# Altium PCB SX1262MB2xAS_e499v01b.PcbDoc
Units mm, origin at the board's own origin, x right, y up, seen from the top; angles counter-clockwise.
Board outline 65 x 53.3 mm, 4 copper layers (Top Layer, MidLayer1, MidLayer2, Bottom Layer), stack 0.986 mm thick; 64 components, 41 nets, 172 pads, 838 vias.
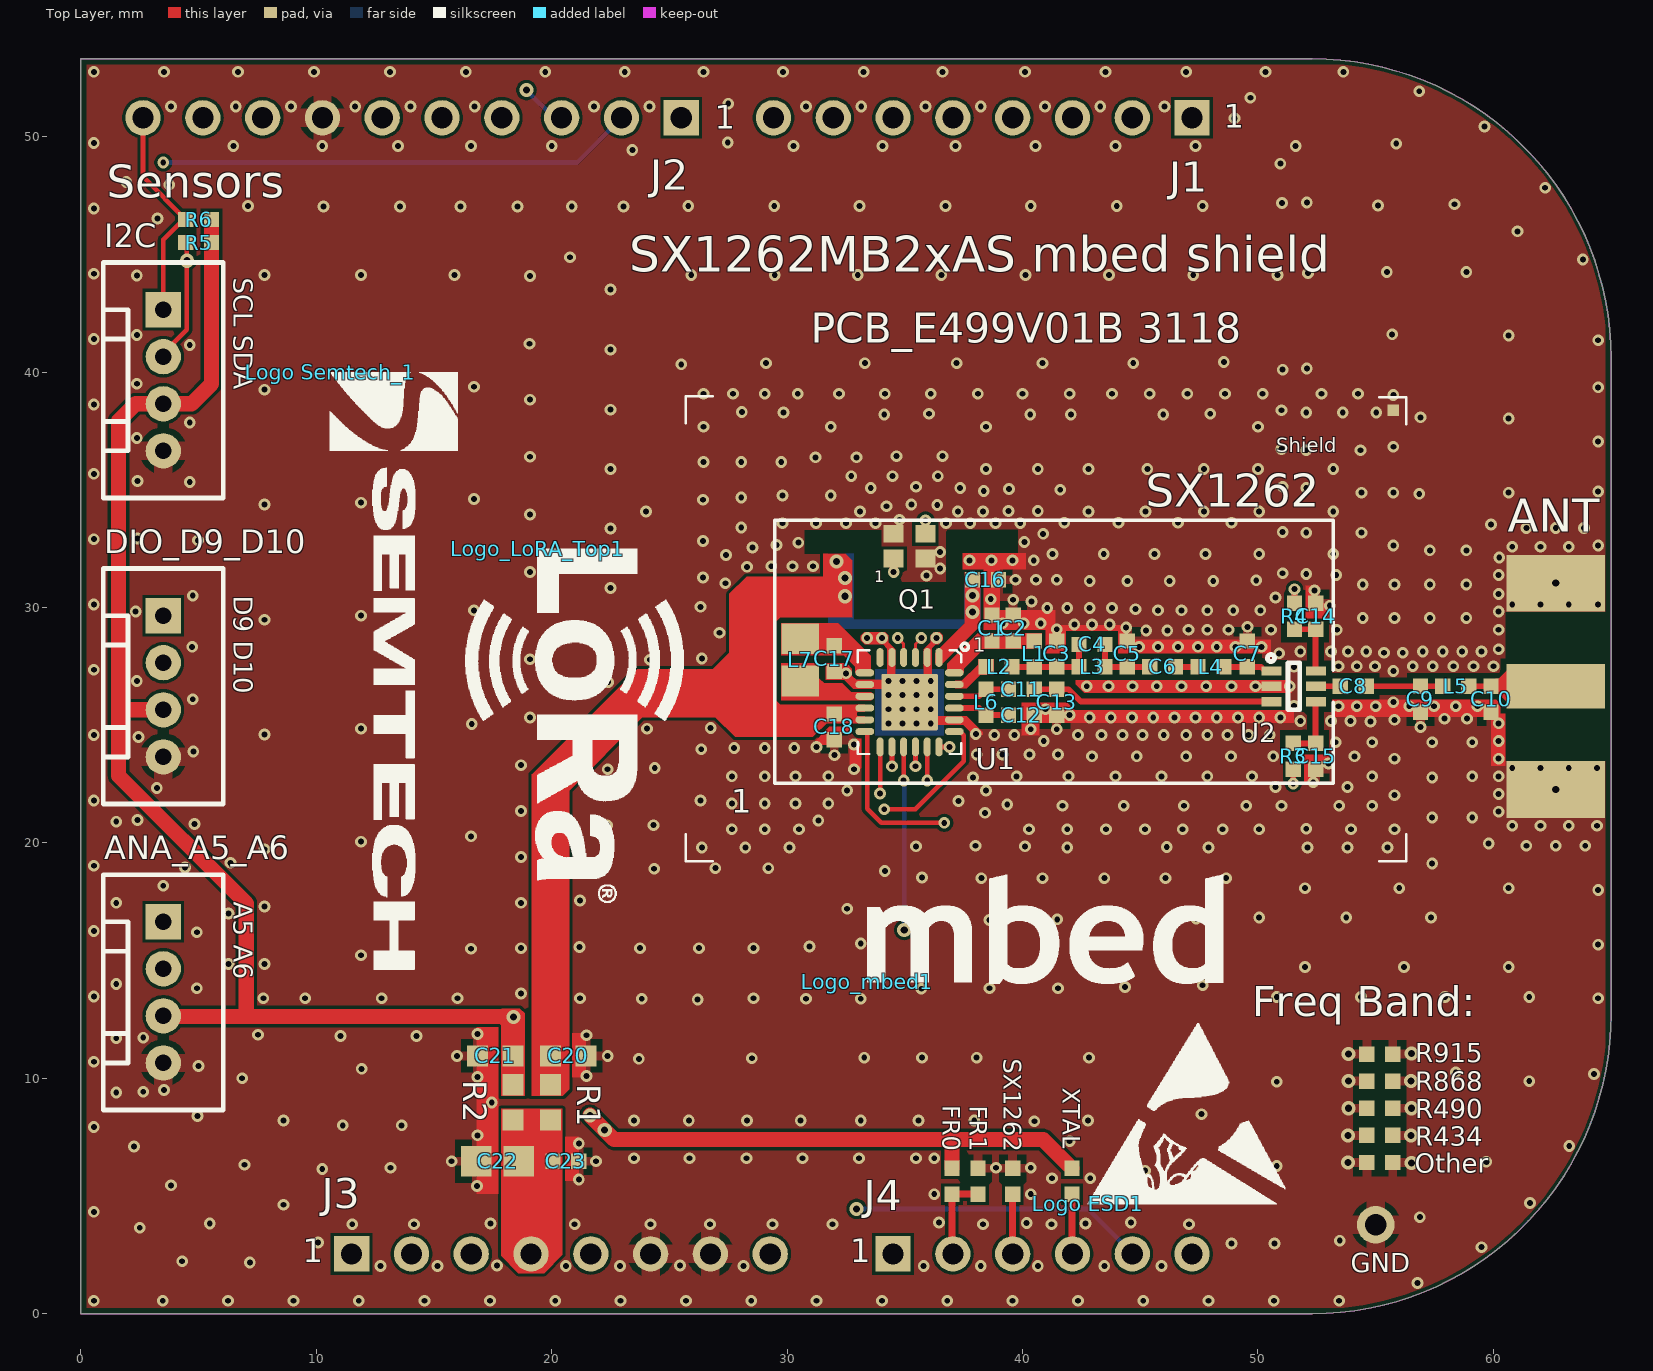
[diagram p0: Top Layer view]
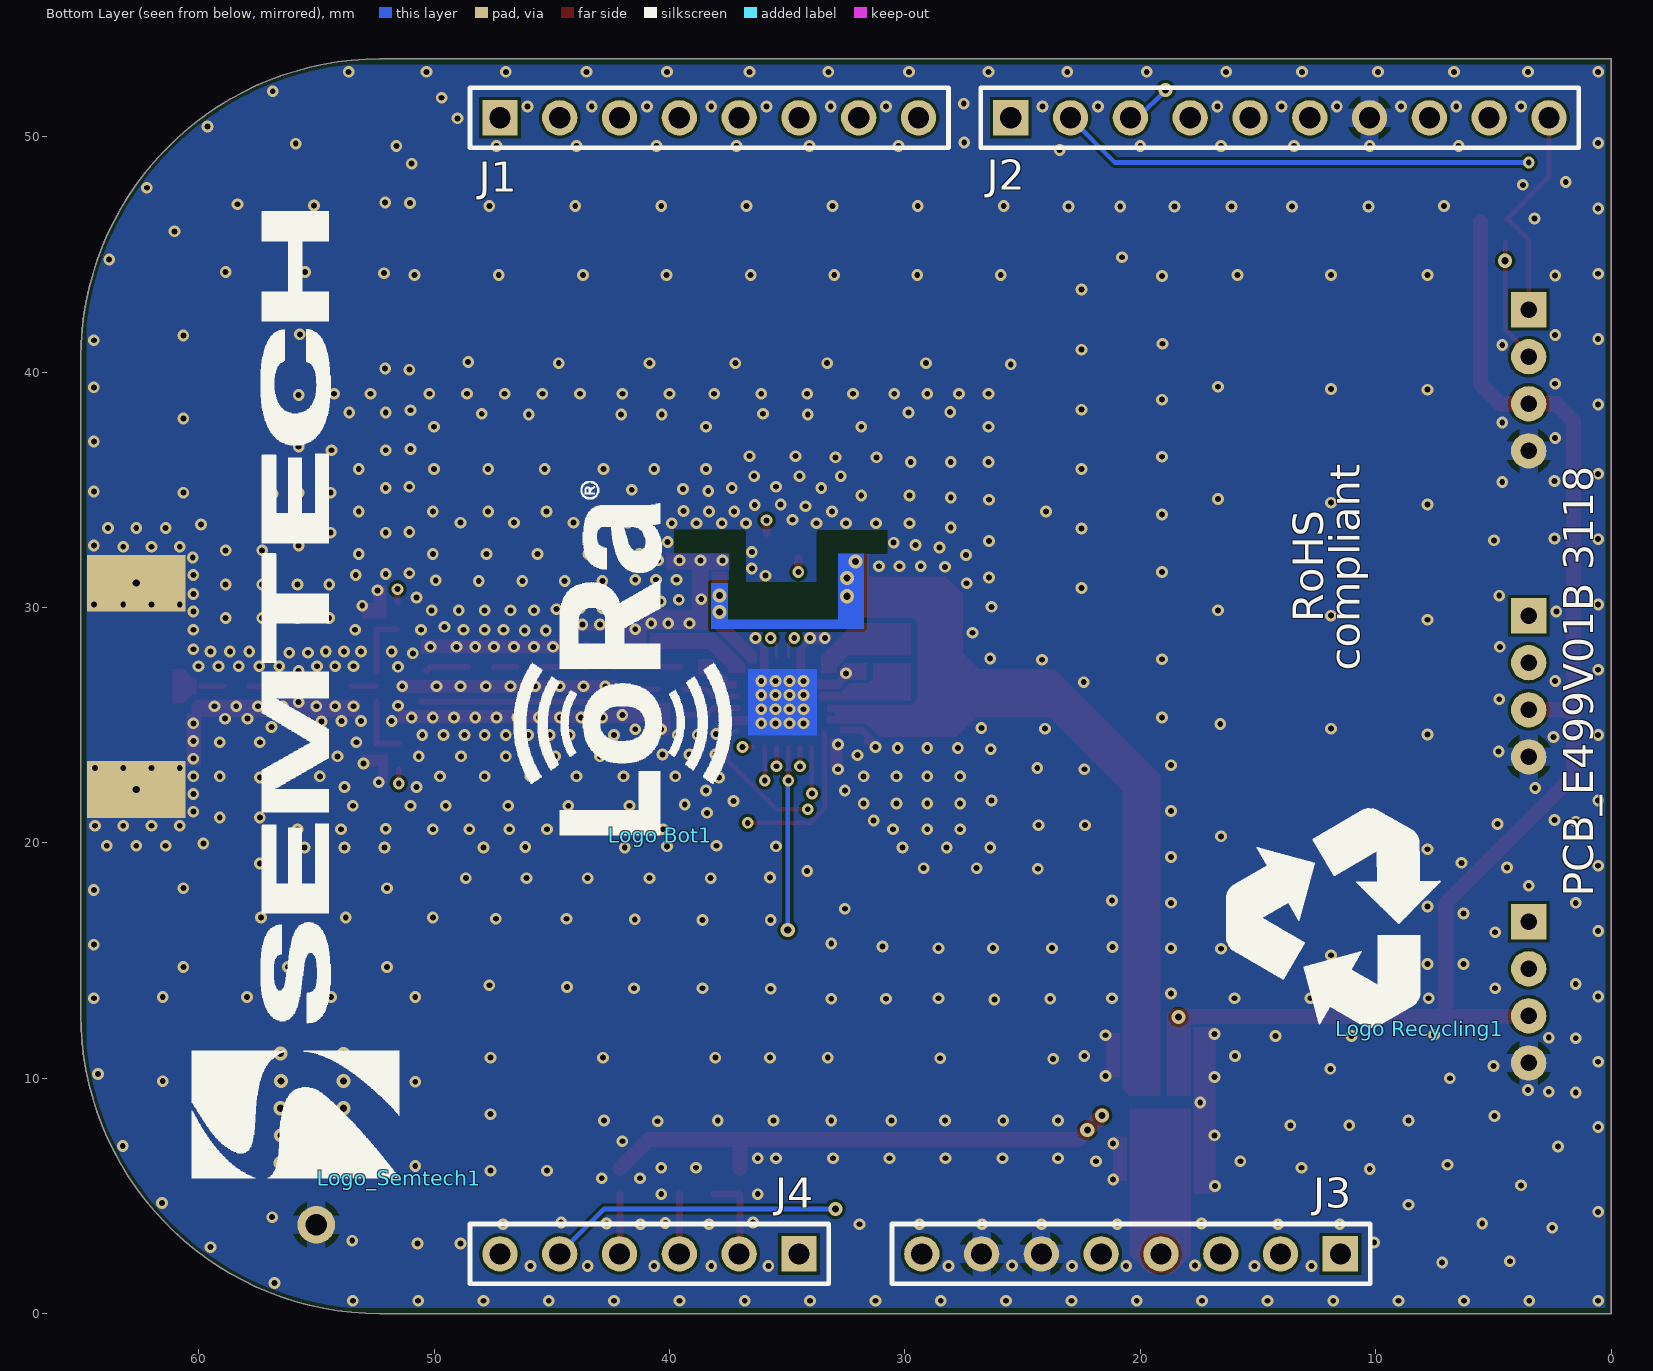
[diagram p1: Bottom Layer view, seen from below]
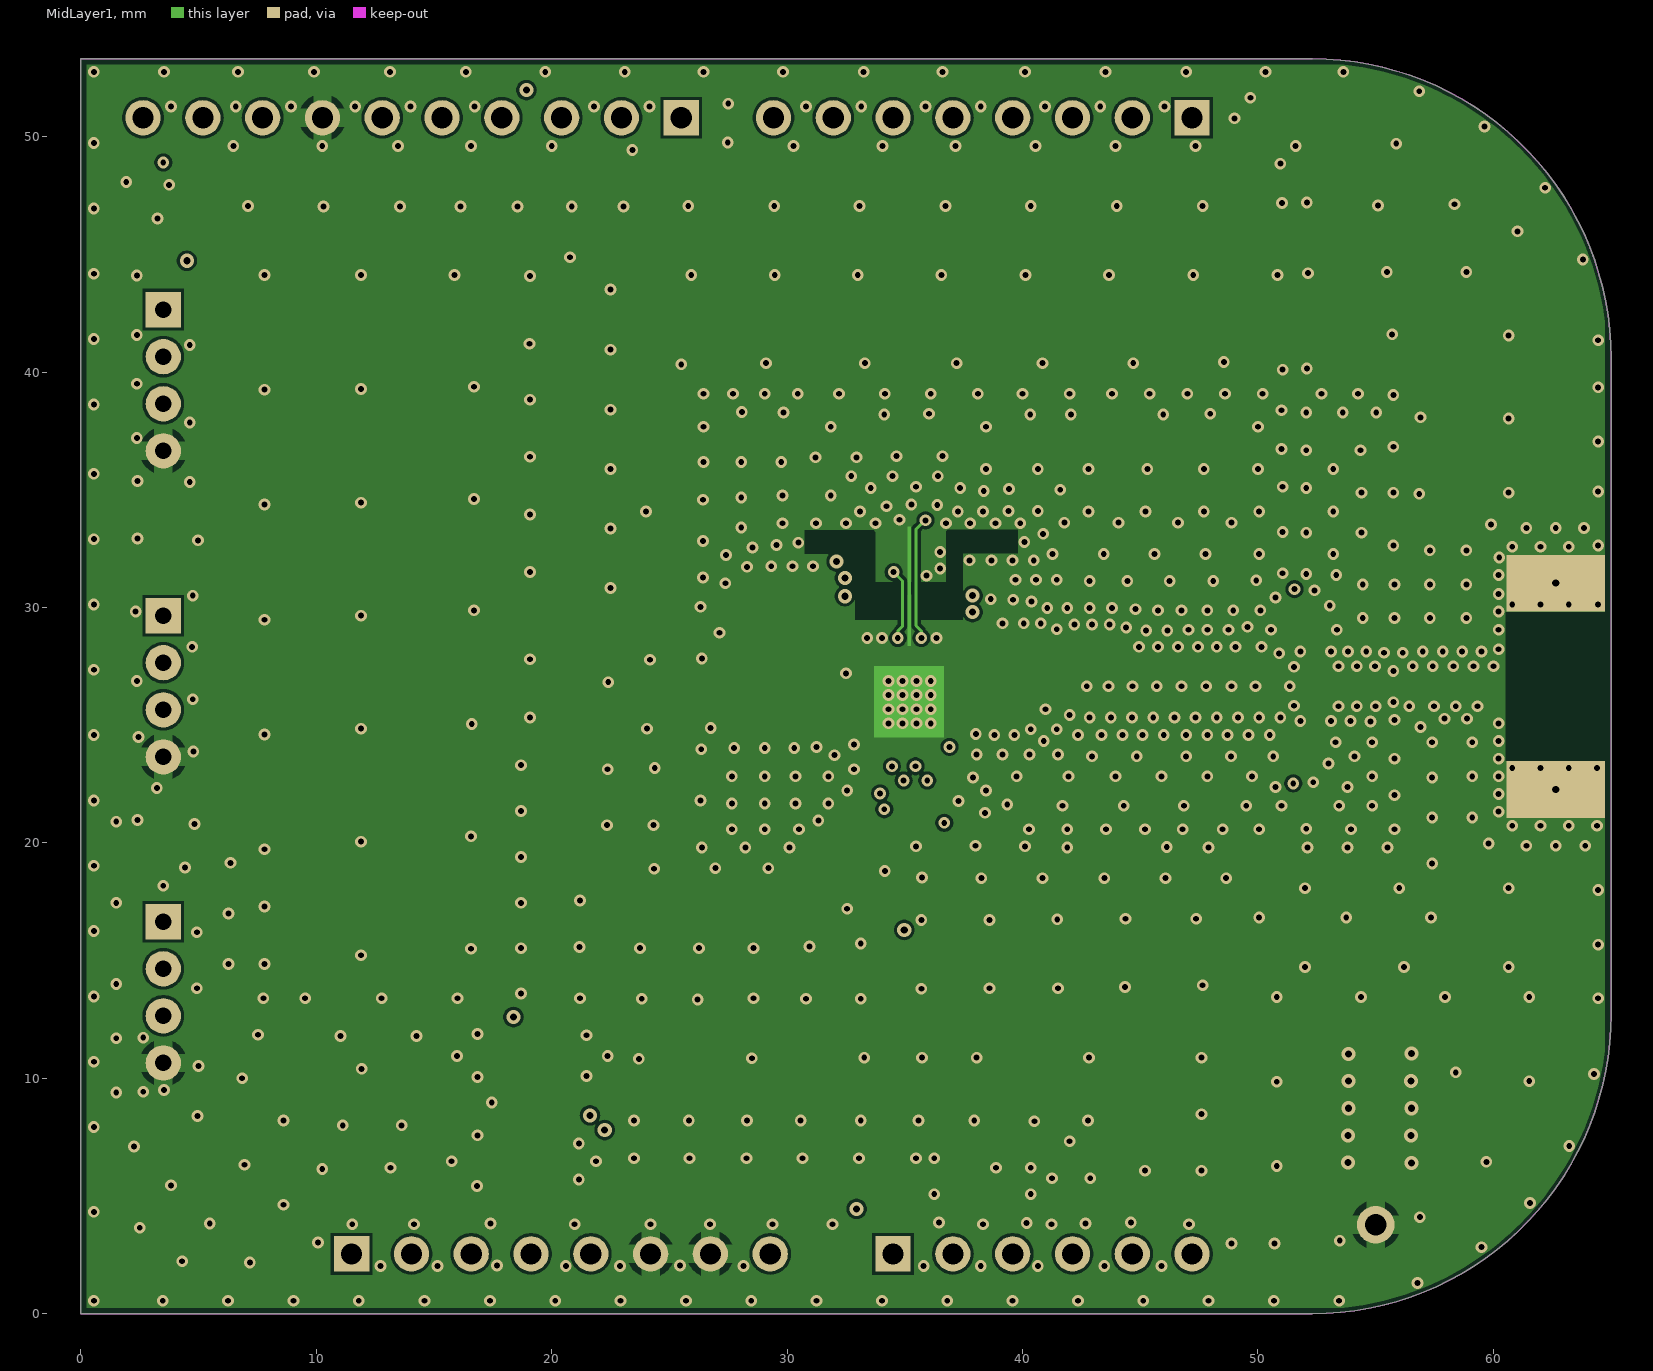
[diagram p2: MidLayer1]
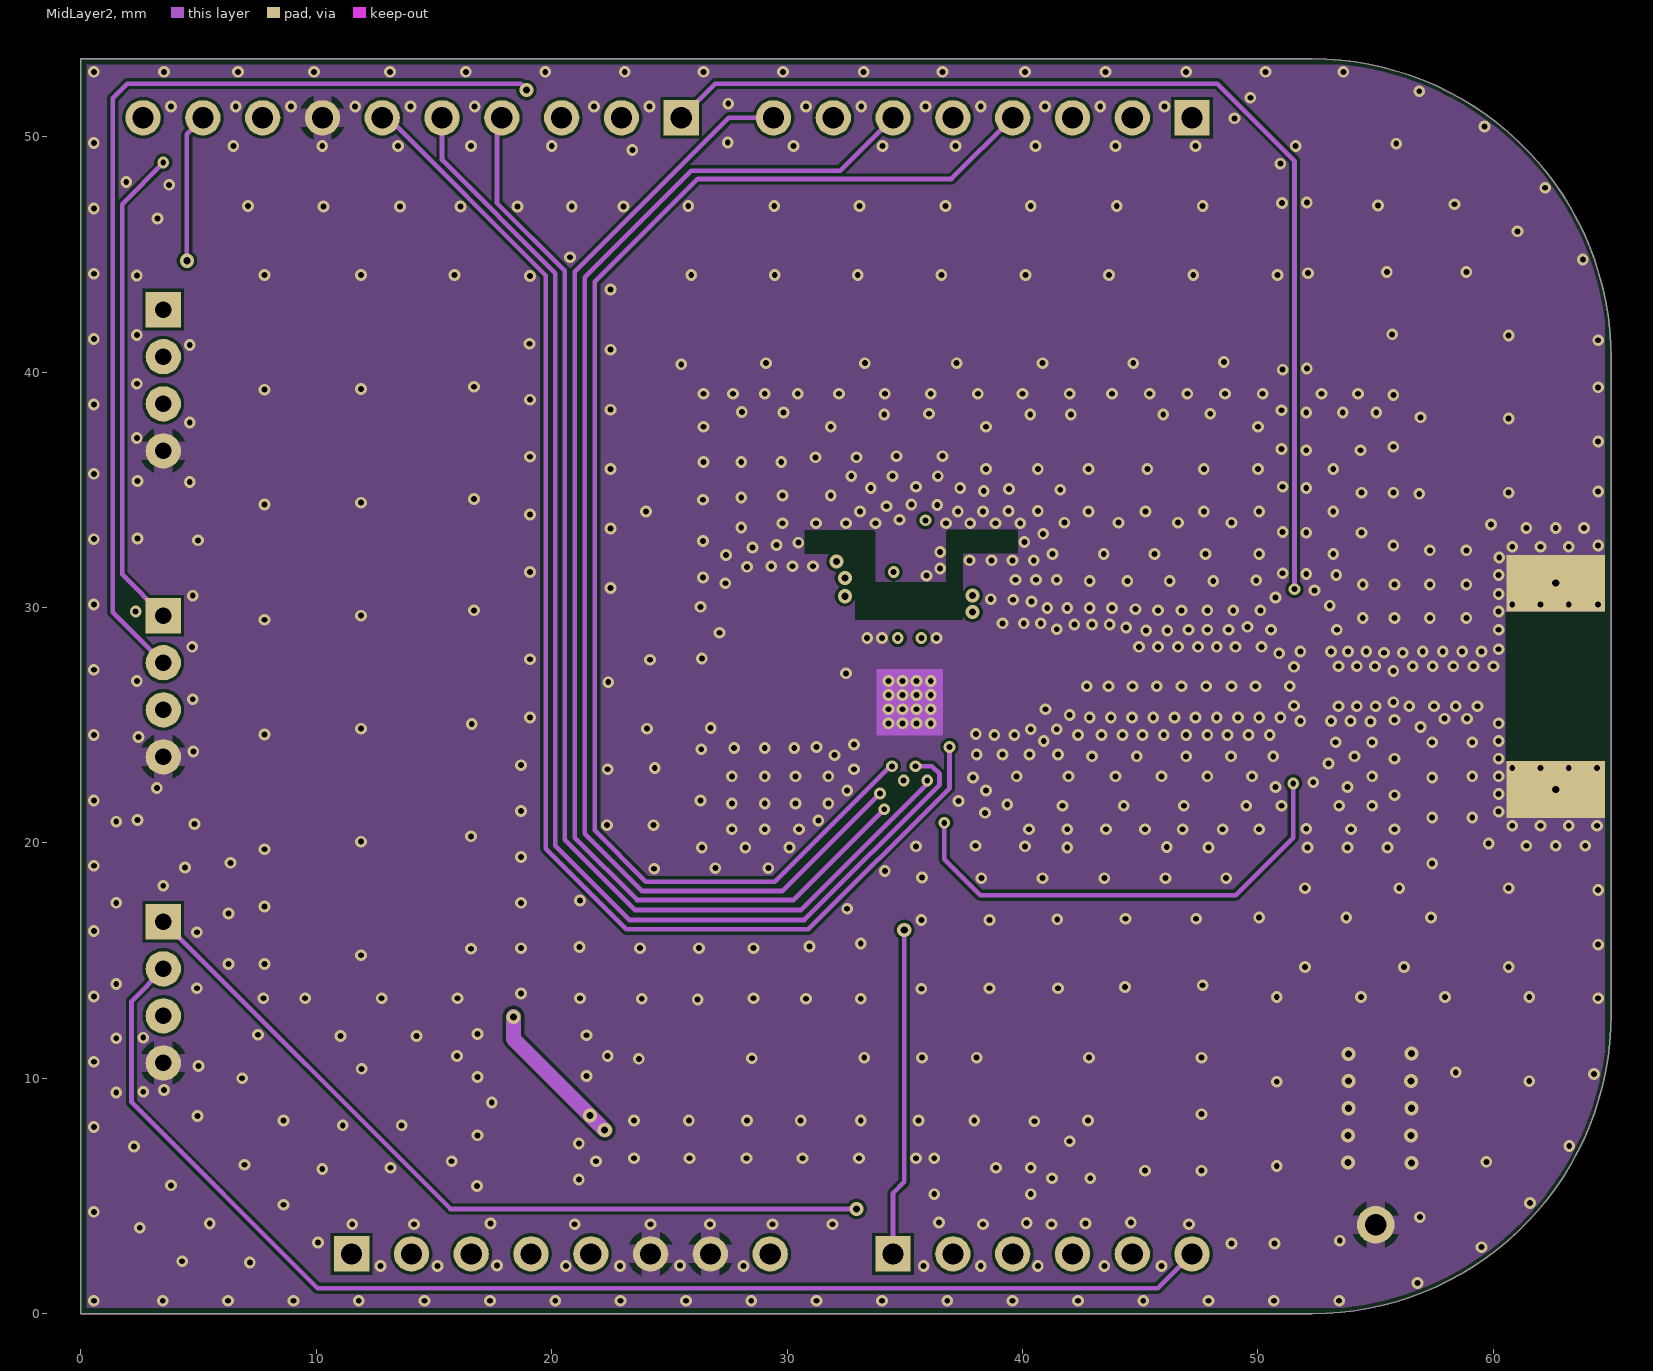
[diagram p3: MidLayer2]

## Layer stack, top to bottom
Top Solder: solder mask 0.0102, Solder Resist, Dk 3.5
Top Layer: signal copper 0.035
Dielectric1: core 0.15, FR-4, Dk 4.4
MidLayer1: signal copper 0.018
Dielectric3: prepreg 0.58, FR-4, Dk 4.4
MidLayer2: signal copper 0.018
Dielectric2: core 0.15, FR-4, Dk 4.4
Bottom Layer: signal copper 0.035
Bottom Solder: solder mask 0.0102, Solder Resist, Dk 3.5

## Board outline
0,0 52.3,0 ccw(c52.3,12.7) 65,12.7 65,40.6 ccw(c52.3,40.6) 52.3,53.3 0,53.3

## Design rules (kind name [scope] priority, off if disabled: settings)
Clearance Clearance_RF_GND [InNet('GND') And OnLayer('Top Layer') And (InPoly) vs InNet('NetL*') or InNet('NetC*') or InNet('NetU*')] p1: gap=0.25 ignorepadtopadclearanceinfootprint=FALSE except(0: Arc-Hole Track-Hole SMDPad-Hole THPad-Hole Via-Hole Fill-Hole Poly-Hole Region-Hole Text-Hole)
Clearance Clearance_GND_Keepout [InNet('GND') vs OnLayer('Keep-Out Layer')] p2: gap=0.15 ignorepadtopadclearanceinfootprint=FALSE except(0: Arc-Hole Track-Hole SMDPad-Hole THPad-Hole Via-Hole Fill-Hole Poly-Hole Region-Hole Text-Hole)
Clearance Clearance_GND [InNet('GND')] p3: gap=0.127 ignorepadtopadclearanceinfootprint=FALSE
Clearance [All] p4: gap=0.15 ignorepadtopadclearanceinfootprint=FALSE except(0: Arc-Hole Track-Hole SMDPad-Hole THPad-Hole Via-Hole Fill-Hole Poly-Hole Region-Hole Text-Hole)
ComponentClearance ComponentClearance_SMA_RFIO [InComponent('RFIO')] p1: gap=0.1 collisioncheckmode=3 verticalgap=0.1 showdistances=FALSE
ComponentClearance [All] p2: gap=0.2 collisioncheckmode=3 verticalgap=0.3 showdistances=FALSE
HoleSize [All] p1: absolutevalues=TRUE maxlimit=3.6 minlimit=0.25 maxpercent=80.000 minpercent=20.000
HoleToHoleClearance [All] p1: gap=0.2 allowstackedmicrovias=TRUE
MinimumSolderMaskSliver [All] p1: minsoldermaskwidth=0.04
PlaneClearance [All] p1: clearance=0.2
PlaneConnect [All] p1: planeconnectstyle=Direct reliefexpansion=0.508 reliefentries=4 reliefconductorwidth=0.254 reliefairgap=0.254
PolygonConnect "PolygonConnect SMD" [InNet('GND') vs HasFootprint('rlc_603_smd') or HasFootprint('rlc_402_smd') or hasFootprint('rlc_805_smd')  or hasFootprint('SOT353-5') or hasFootprint('VQFN24_4X4MM')] p1: connectstyle=Relief reliefconductorwidth=0.4 reliefentries=4 polygonreliefangle="90 Angle" airgapwidth=0.254
PolygonConnect PolygonConnect_comp_diverse [InNet('GND') vs HasFootprint('LGM676 LED') or  HasFootprint('BRIDGE_254MM') or  HasFootprint('pin_0.9mm')  or  HasFootprint('1125S-4P_connector')  or  HasFootprint('HDR1X10') or  HasFootprint('vqfn20_3x3mm') or    HasFootprint('HDR1X8')  or  HasFootprint('HDR1X6')] p2: connectstyle=Relief reliefconductorwidth=0.8 reliefentries=4 polygonreliefangle="90 Angle" airgapwidth=0.254
PolygonConnect PolygonConnect_all [All] p3: connectstyle=Direct reliefconductorwidth=0.6 reliefentries=4 polygonreliefangle="90 Angle" airgapwidth=0.254
RoomDefinition SX1262MB2xAS_e499v01b [InComponentClass('SX1262MB2xAS_e499v01b')] p1: confinementstyle=ConfineOut formatcopy=TRUE lockcomponents=FALSE outline -10.5,78.325 -10.55,78.375 -10.55,121.325 43.45,121.325 43.3,121.175 43.3,78.325
RoutingVias [All] p1: holewidth=0.3 width=0.6 viastyle="Through Hole" minholewidth=0.25 minwidth=0.5 maxholewidth=0.4 maxwidth=0.8
SilkToSilkClearance [All] p1: silktosilkclearance=0.05
SilkToSolderMaskClearance SilkscreenOverComponentPads [IsPad] p1: minsilkscreentomaskgap=0.05 clearancetoexposedcopper=TRUE
SolderMaskExpansion [All] p1: expansion=0.05
Width "Width GND" [InNet('GND')] p1: maxlimit=3 minlimit=0.2 preferedwidth=0.4
Width Width_VCC [InNet('VDD') or  InNet('VDISPLAY') or  InNet('VDD_MBED')  or  InNet('VUSB')  or  InNet('VDD_3V3')] p2: maxlimit=2 minlimit=0.2 preferedwidth=0.8
Width "Width All" [All] p3: maxlimit=2 minlimit=0.127 preferedwidth=0.2
22 further rules are at their usual default settings.

## Components (designator, comment, footprint, x,y, rotation, side; value= is the part's Value field where it differs from the comment)
ANA_A5_A6 "Header 4" 1125S-4P_connector 3.5,16.65 r270 top locked
ANT "SMA" SMA_end_launch_1.0mm_9.52mm 62.65,26.65 r0 top locked
C1 "Cap" RLC_402_SMD 38.7,29.125 r270 top value=NC
C2 "Cap" RLC_402_SMD 39.6,29.125 r270 top value=NC
C3 "Cap" RLC_402_SMD 41.45,28.025 r270 top value=NC
C4 "Cap" RLC_402_SMD 42.95,28.425 r180 top value=NC
C5 "Cap" RLC_402_SMD 44.45,28.025 r270 top value=NC
C6 "Cap" RLC_402_SMD 45.95,27.475 r180 top value=NC
C7 "Cap" RLC_402_SMD 49.55,28.025 r270 top value=NC
C8 "Cap" RLC_402_SMD 54.05,26.65 r180 top value=NC
C9 "Cap" RLC_402_SMD 56.9,26.1 r90 top value=NC
C10 "Cap" RLC_402_SMD 59.9,26.1 r90 top value=NC
C11 "Cap" RLC_402_SMD 39.95,26.525 r180 top value=NC
C12 "Cap" RLC_402_SMD 39.95,25.425 r180 top value=NC
C13 "Cap" RLC_402_SMD 41.45,25.975 r90 top value=NC
C14 "Cap" RLC_402_SMD 52.45,29.625 r90 top value=1nF
C15 "Cap" RLC_402_SMD 52.45,23.675 r270 top value=1nF
C16 "Cap" RLC_402_SMD 38.425,31.175 r180 top value=1uF
C17 "Cap" RLC_402_SMD 32,27.825 r90 top value=470nF
C18 "Cap" RLC_402_SMD 32,24.925 r90 top value=100nF
C20 "Cap" rlc_603_smd 20.7,10.95 r180 top value=1uF
C21 "Cap" rlc_603_smd 17.6,10.95 r0 top value=1uF
C22 "Cap" rlc_805_smd 17.7,6.475 r0 top value=10uF
C23 "Cap" rlc_402_smd 20.6,6.475 r180 top value=100nF
DIO_D9_D10 "Header 4" 1125S-4P_connector 3.5,29.65 r270 top locked
FR0 "Resistor" rlc_402_smd 37,5.625 r270 top value=1k
FR1 "Resistor" rlc_402_smd 38.111,5.625 r270 top value=NC
GND "Test Pin" pin_0.9mm 51.45,9.775 r90 top
I2C "Header 4" 1125S-4P_connector 3.5,42.65 r270 top locked
J1 "Header 8" HDR1X8 47.2,50.8 r180 bottom locked
J2 "Header 10" HDR1X10 25.5,50.8 r180 bottom locked
J3 "Header 8" HDR1X8 11.5,2.54 r0 bottom locked
J4 "Header 6" HDR1X6 34.5,2.54 r0 bottom locked
L1 "Inductor" RLC_402_SMD 40.5,28.025 r90 top value=0R
L2 "Inductor" RLC_402_SMD 39,27.475 r0 top value=0R
L3 "Inductor" RLC_402_SMD 42.95,27.475 r0 top value=0R
L4 "Inductor" RLC_402_SMD 48,27.475 r0 top value=0R
L5 "Inductor" RLC_402_SMD 58.4,26.65 r0 top value=0R
L6 "Inductor" RLC_402_SMD 38.45,25.975 r90 top value=0R
L7 "Inductor" "rlc_805_smd enlarged" 30.55,27.775 r270 top value=15uH
"Logo Bot1" "Logo symbol" "Logo LoRa Size4" 40.4,20.325 r90 bottom
"Logo ESD1" "Logo symbol" "Logo ESD" 42.775,4.674 r0 top
"Logo Recycling1" "Logo symbol" "Logo Recycling1" 8.125,12.1 r90 bottom
"Logo Semtech_1" "Logo symbol" logo_semtech_horiz_size3 10.6,40 r270 top locked
Logo_LoRA_Top1 "Logo symbol" "Logo LoRa Size4" 19.4,32.5 r270 top locked
Logo_mbed1 "Logo symbol" "logo mbed 2" 33.4,14.1 r0 top
Logo_Semtech1 "Logo symbol" logo_semtech_horiz_size4 51.475,5.75 r90 bottom
Other "Resistor" rlc_402_smd 55.175,6.425 r180 top value=NC
Q1 "Xtal" nd2016da 35.2,32.6 r0 top locked value=32.0MHz
R1 "Resistor" rlc_603_smd 19.95,8.975 r270 top value=0R
R2 "Resistor" rlc_603_smd 18.35,8.975 r270 top value=0R
R3 "Resistor" RLC_402_SMD 51.5,23.675 r270 top value=100R
R4 "Resistor" RLC_402_SMD 51.55,29.625 r90 top value=100R
R5 "Resistor" rlc_402_smd 5,45.5 r0 top value=3.3k
R6 "Resistor" rlc_402_smd 5,46.475 r0 top value=3.3k
R434 "Resistor" RLC_402_SMD 55.175,7.575 r0 top value=NC
R490 "Resistor" rlc_402_smd 55.175,8.725 r180 top value=NC
R868 "Resistor" RLC_402_SMD 55.175,9.875 r0 top value=NC
R915 "Resistor" RLC_402_SMD 55.175,11.025 r180 top value=NC
Shield "Logo symbol" "BMIS-209-F - Shield" 55.75,38.375 r180 top
SX1262 "Resistor" rlc_402_smd 39.58,5.625 r270 top value=10k
U1 "SX1262" VQFN24_4X4MM 35.2,25.975 r270 top
U2 "PE4259 RF Switch" SC70-6 51.525,26.65 r0 top
XTAL "Resistor" rlc_402_smd 42.1,5.625 r270 top value=1k

## Footprints (in the part's own frame and the unit in brackets; to place one, negate y for a bottom-side part, rotate by r counter-clockwise, add the part's x,y. Pads: shape width x height; smd on the part's side, far side on the other; paste and mask are expansions set on the pad)
1125S-4P_connector [mm] "Connector; Header; 4 Position; P/N: 1125S-4P; Manuf: TAIFENG"
  rect 1.5x1.5 hole 0.7 mask+0.05: 1(0,0)
  round 1.5 hole 0.7 mask+0.05: 2(2,0) 3(4,0) 4(6,0)
  silkscreen extent -2,-2.55 8,2.55, body extent -2,-2.55 8,2.55, height 2.95
"BMIS-209-F - Shield" [mm] "BMIS-209-F EMI Gasket - modif SolderMask - Standard Surface Mount Shields -  Laird Technologies"
  rect 0.5x0.5 smd paste-1 mask+0.05: 1(0,0)
  Mechanical 15 keep-out lines w1: 29.5,18.6 29.5,0 0,0 0,18.6 29.5,18.6
  silkscreen extent -0.55,-0.6 30.05,19.15, body extent -0.3,-0.3 0.3,0.3, height 0.8
HDR1X6 [mm] "Connector; Header; 6 Position"
  rect 1.5x1.5 hole 0.9: 1(0,0)
  round 1.5 hole 0.9: 2(2.54,0) 3(5.08,0) 4(7.62,0) 5(10.16,0) 6(12.7,0)
  silkscreen extent -1.27,-1.27 13.97,1.27, body extent -0.8,-0.8 13.5,0.8
HDR1X8 [mm] "Connector; Header; 8 Position"
  rect 1.5x1.5 hole 0.9: 1(0,0)
  round 1.5 hole 0.9: 2(2.54,0) 3(5.08,0) 4(7.62,0) 5(10.16,0) 6(12.7,0) 7(15.24,0) 8(17.78,0)
  silkscreen extent -1.27,-1.27 19.05,1.27, body extent -0.8,-0.8 18.58,0.8
HDR1X10 [mm] "Connector; Header; 10 Position"
  rect 1.5x1.5 hole 0.9: 1(0,0)
  round 1.5 hole 0.9: 2(2.54,0) 3(5.08,0) 4(7.62,0) 5(10.16,0) 6(12.7,0) 7(15.24,0) 8(17.78,0) 9(20.32,0) 10(22.86,0)
  silkscreen extent -1.27,-1.27 24.13,1.27, body extent -0.8,-0.8 23.66,0.8
"Logo ESD" [mm] "Logo ESD"
  silkscreen extent 0,0 8.38,7.67
"Logo LoRa Size4" [mm] "Logo LoRa Size4 - Top Overlay - 18x9.5mm - Registered"
  silkscreen extent 0,-3.05 15.04,6.2
"logo mbed 2" [mm] "logo mbed 2"
  silkscreen extent 0,-0.06 15.12,4.54
"Logo Recycling1" [mm] "Logo Recycling1"
  silkscreen extent 0.05,-0.88 9.36,8.2
logo_semtech_horiz_size3 [mm] "Logo semtech horizontal - size3 - L"
  silkscreen extent 0,0 25.4,5.41
logo_semtech_horiz_size4 [mm] "Logo semtech horizontal - size4 - XL"
  silkscreen extent 0,0 41.07,8.79
nd2016da [mm] "Crystal SMD 2.0x1.6mm"
  rect 0.85x0.75 smd mask+0.05: 1(-0.675,-0.525) 2(0.675,-0.525) 3(0.675,0.525) 4(-0.675,0.525)
  body extent -1,-0.8 1,0.8, height 1
pin_0.9mm [mm] "Generic Pin 0.9mm; 1 Lead"
  round 1.6 hole 0.9 mask+0.05: 1(-6,-3.55)
RLC_402_SMD [mm] "Chip SMD component 402; Body 1.0 x 0.5 mm (LxW typ)"
  rect 0.65x0.65 smd mask+0.05: 1(-0.55,0) 2(0.55,0)
  body extent -0.87,-0.33 0.87,0.33, height 0.8
rlc_402_smd [mm] "Chip SMD component 402; Body 1.0 x 0.5 mm (LxW typ)"
  rect 0.65x0.65 smd mask+0.05: 1(-0.55,0) 2(0.55,0)
  body extent -0.87,-0.33 0.87,0.33, height 0.8
rlc_603_smd [mm] "Chip SMD component 603; Body 1.6 x 0.8mm (LxW typ)"
  rect 0.9x0.9 smd paste+0 mask+0.05: 1(-0.75,0) 2(0.75,0)
rlc_805_smd [mm] "Chip SMD component 805; Body 2.0 x 1.25 mm (LxW typ)"
  rect 1.3x1.3 smd mask+0.05: 1(-0.9,0) 2(0.9,0)
"rlc_805_smd enlarged" [mm] "Chip SMD component 805; Body 2.0 x 1.25 mm (LxW typ)"
  rect 1.3x1.6 smd mask+0.05: 1(-0.9,0) 2(0.9,0)
SC70-6 [mm] "SC70 6-Leads, Body 2.0x1.25mm, Pitch 0.65mm"
  rect 0.85x0.4 smd mask+0.05: 1(-0.95,0.65) 2(-0.95,0) 3(-0.95,-0.65) 4(0.95,-0.65) 5(0.95,0) 6(0.95,0.65)
  silkscreen extent -1.12,-1 0.25,1.35, body extent -0.63,-1 0.63,1, height 1.45
SMA_end_launch_1.0mm_9.52mm [mm] "SMA end launch for 1.0mm PCB thickness; 9.52mm"
  rect 4.2x1.905 smd mask+0.05: 1(0,0)
  rect 4.2x2.413 hole 0.3 mask+0.05: 2(0,-4.38) 2(0,4.38)
VQFN24_4X4MM [mm] "24 Leads, Body 4.0x4.0mm, Pitch 0.50mm, VQFN24"
  oval 0.8x0.3 smd mask+0.05: 1(-1.9,1.25) 2(-1.9,0.75) 3(-1.9,0.25) 4(-1.9,-0.25) 5(-1.9,-0.75) 6(-1.9,-1.25) 13(1.9,-1.25) 14(1.9,-0.75) 15(1.9,-0.25) 16(1.9,0.25) 17(1.9,0.75) 18(1.9,1.25)
  oval 0.3x0.8 smd mask+0.05: 7(-1.25,-1.9) 8(-0.75,-1.9) 9(-0.25,-1.9) 10(0.25,-1.9) 11(0.75,-1.9) 12(1.25,-1.9) 19(1.25,1.9) 20(0.75,1.9) 21(0.25,1.9) 22(-0.25,1.9) 23(-0.75,1.9) 24(-1.25,1.9)
  rrect5% 2.4x2.4 smd paste-2.5 mask+0.05: 25(0,0)
  Mechanical 15 keep-out lines w0.1: 2.5,-2.5 2.5,2.5 -2.5,2.5 -2.5,-2.5 2.5,-2.5
  silkscreen extent -2.5,-2.2 2.2,2.5, body extent -2,-2 2,2, height 1

## Part data
ANA_A5_A6 DIO_D9_D10 I2C: "Header, 4-Pin", LatestRevisionDate=17-Jul-2002, LatestRevisionNote="Re-released for DXP Platform.", Publisher="Altium Limited"
ANT: "SMA Straight Connector", LatestRevisionDate="05-oct-2007  -  Semtech", LatestRevisionNote="Re-released for DXP Platform.", Publisher="Altium Limited"
C1 C2 C3 C4 C5 C6 C7 C8 C9 C10 C11 C12 C13 C14 C15 C16 C17 C18 C20 C21 C22 C23: "Capacitor SMD", LatestRevisionDate="05-oct-2007  -  Semtech", LatestRevisionNote="Re-released for DXP Platform.", Published=8-Jun-2000, Publisher="Altium Limited"
FR0 FR1 Other R1 R2 R3 R4 R5 R6 R434 R490 R868 R915 SX1262 XTAL: "Resistor SMD - IEC symbol version", LatestRevisionDate="27-Jul-20  -  Semtech"
GND: library part test_pin, LatestRevisionDate="05-oct-2007  -  Semtech"
J1 J3: "Header, 8-Pin", LatestRevisionDate=17-Jul-2002, LatestRevisionNote="Re-released for DXP Platform.", Publisher="Altium Limited"
J2: "Header, 10-Pin", LatestRevisionDate=17-Jul-2002, LatestRevisionNote="Re-released for DXP Platform.", Publisher="Altium Limited"
J4: "Header, 6-Pin", LatestRevisionDate=17-Jul-2002, LatestRevisionNote="Re-released for DXP Platform.", Publisher="Altium Limited"
L1 L2 L3 L4 L5 L6 L7: "Inductor SMD", Code_IEC=1005, Code_JEITA=0402, LatestRevisionDate="05-oct-2007  -  Semtech", LatestRevisionNote="Re-released for DXP Platform.", Published=8-Jun-2000, Publisher="Altium Limited"
"Logo Bot1" "Logo ESD1" "Logo Recycling1" "Logo Semtech_1" Logo_LoRA_Top1 Logo_mbed1 Logo_Semtech1: library part Logo, "Schematic symbol for Logo"
Q1: library part "Xtal GND", "Crystal with GND pins", LatestRevisionDate="05-oct-2007  -  Semtech"
Shield: library part Shield, "Shield - EMI Gasket - Standard Surface Mount Shields"
U1: library part SX126x, "SX1262- Ultra low power RF transceiver"
U2: "PE4259 Peregrine RF Switch", LatestRevisionDate="03-Sep-2012 -  Semtech"

## Via types
v1: diameter 0.5, hole 0.25, Top Layer to Bottom Layer, tented both sides, 816 vias
v2: diameter 0.6, hole 0.3, Top Layer to Bottom Layer, tented both sides, 22 vias

## Nets (pads, with @x,y where several pads share a name; then routed paths per layer and width w, separated by ;. In a path a pad name is that pad's centre, name@x,y a point inside that pad or via, vN(x,y) a via of type N, cw(c..) or ccw(c..) an arc to the next point about the centre after c; other vN are vias at no path point)
A5: ANA_A5_A6.1 J4.5 | length 47
  MidLayer2 w0.2: ANA_A5_A6.1 15.7,4.45 v2(32.95,4.45)
  Bottom Layer w0.2: v2(32.95,4.45) 42.775,4.45 J4.5@44.675,2.55
A6: ANA_A5_A6.2 J4.6 | length 55.2
  MidLayer2 w0.2: ANA_A5_A6.2@3.525,14.65 2.15,13.275 2.15,8.975 10.05,1.075 45.735,1.075 J4.6
ANT_SW: J2.1 R4.2 | length 46.8
  Top Layer w0.25: R4.2 v1(51.55,30.775)
  MidLayer2 w0.2: J2.1 26.95,52.25 48.275,52.25 51.55,48.975 v1(51.55,30.775)
BUSY: J1.4 U1.14 | length 60.3
  Top Layer w0.2: v1(34.45,23.25) U1.14
  MidLayer2 w0.2: v1(34.45,23.25) 34.375,23.25 29.475,18.35 24,18.35 21.825,20.525 21.825,43.825 26.2,48.2 36.98,48.2 J1.4
D9: DIO_D9_D10.1 J2.2 | length 41
  MidLayer2 w0.2: DIO_D9_D10.1 1.75,31.4 1.75,47.125 v1@3.55,48.925
  Bottom Layer w0.2: v1(3.5,48.9) 21.075,48.9 J2.2@22.975,50.8
D10: DIO_D9_D10.2 J2.3 | length 45.2
  MidLayer2 w0.2: DIO_D9_D10.2@3.5,27.796 DIO_D9_D10.2 1.35,29.8 1.35,51.625 1.975,52.25 18.675,52.25 18.925,52 v2(18.925,51.975)
  Bottom Layer w0.2: v2(18.925,51.975) 20.1,50.8 J2.3@20.4,50.8 ; J2.3@20.15,50.775 J2.3@20.4,50.775
DIO1: J1.6 U1.13 | length 56.8
  Top Layer w0.2: v1(33.95,22.1) U1.13
  MidLayer2 w0.2: v1(33.95,22.1) 29.8,17.95 23.838,17.95 21.4,20.388 21.4,44.025 25.925,48.55 32.25,48.55 J1.6 ; v1@34.025,22.15 v1@34.05,22.15
DIO2: R3.2 U1.12 | length 27.7
  Top Layer w0.2: U1.12@33.437,24.663 33.4,24.625 33.4,21.446 33.996,20.85 v1(36.675,20.85) v1@36.625,20.85
  Top Layer w0.25: v1(51.5,22.525) R3.2
  MidLayer2 w0.2: v1(36.675,20.85) 36.675,19.3 38.2,17.775 49.05,17.775 49.1,17.825 51.5,20.225 v1(51.5,22.525)
DIO3: U1.6
GND: ANA_A5_A6.4 ANT.2 C1.1 C2.1 C3.1 C5.1 C7.1 C9.1 C10.1 C12.1 C13.1 C14.2 C15.2 C16.1 C17.1 C18.1 C20.1 C21.1 C22.1 C23.1 DIO_D9_D10.4 FR1.1 GND.1 I2C.4 J2.7 J3.6 J3.7 Other.1 Other.2 Q1.2 Q1.4 R434.1 R434.2 R490.1 R490.2 R868.1 R868.2 R915.1 R915.2 Shield.1 SX1262.1 U1.2 U1.5 U1.8 U1.20 U1.25 U2.2 | length 4.1
  Top Layer w0.3: U1.8 U1.25@34.3,26.725 ; U1.25@34.45,26.825 U1.5 ; U1.25@35.95,26.875 U1.2 ; U1.25@36.1,25.175 36.15,25.225 U1.20
  other v1: 0.55,0.55 3.475,0.55 6.25,0.55 9.025,0.55 11.8,0.55 14.6,0.55 17.375,0.55 20.15,0.55 22.925,0.55 25.7,0.55 28.475,0.55 31.25,0.55 34.025,0.55 36.8,0.55 39.575,0.55 42.35,0.55 45.125,0.55 47.9,0.55 50.675,0.55 53.45,0.55 56.775,1.3 12.725,2.025 15.15,2.025 20.6,2.025 22.9,2.025 28.15,2.025 35.8,2.025 38.225,2.025 40.65,2.025 43.475,2.025 45.9,2.025 17.675,2.05 25.45,2.05 7.175,2.175 4.3,2.225 59.5,2.825 48.875,2.975 50.7,2.975 10.075,3.025 53.475,3.1 2.5,3.65 11.525,3.8 14.15,3.8 20.975,3.8 24.2,3.8 26.725,3.8 29.375,3.8 31.925,3.8 38.325,3.8 41.225,3.8 47.075,3.8 5.475,3.825 17.4,3.825 42.675,3.825 40.175,3.85 36.45,3.875 44.6,3.875 56.875,4.1 0.55,4.325 8.6,4.625 61.55,4.7 36.25,5.075 40.35,5.075 16.825,5.425 3.825,5.45 21.15,5.7 41.25,5.75 42.875,5.75 45.2,6.075 47.6,6.075 10.25,6.15 13.15,6.2 38.875,6.2 40.35,6.2 50.8,6.275 6.95,6.325 59.7,6.45 15.75,6.475 21.875,6.475 23.5,6.6 25.85,6.6 28.275,6.6 30.65,6.6 33.05,6.6 35.475,6.6 36.25,6.6 2.25,7.1 63.225,7.125 21.15,7.225 42,7.325 16.85,7.575 0.55,7.925 11.125,8 13.625,8 40.5,8.175 8.6,8.2 23.5,8.2 25.825,8.2 28.3,8.2 30.575,8.2 33.125,8.2 35.575,8.2 37.95,8.2 42.775,8.2 4.95,8.4 47.6,8.475 17.45,8.975 1.5,9.4 2.65,9.425 3.525,9.5 50.8,9.85 61.525,9.875 6.85,10 16.85,10.05 21.475,10.1 64.275,10.175 58.4,10.25 11.925,10.4 5,10.525 0.55,10.7 23.7,10.825 28.5,10.85 33.275,10.875 35.725,10.875 38.05,10.875 42.825,10.875 47.6,10.875 15.975,10.95 22.375,10.95 1.5,11.7 2.65,11.725 11.025,11.8 14.25,11.8 21.475,11.825 7.525,11.85 16.85,11.875 26.2,13.35 23.825,13.375 30.8,13.375 33.125,13.375 7.75,13.4 9.525,13.4 12.775,13.4 16,13.4 21.2,13.4 28.575,13.4 64.45,13.4 50.8,13.45 54.375,13.45 57.95,13.45 61.525,13.45 0.55,13.475 18.7,13.6 35.7,13.8 4.925,13.825 38.6,13.825 41.5,13.825 44.35,13.875 47.65,13.95 1.5,14 52,14.725 56.2,14.725 60.65,14.725 6.275,14.85 7.8,14.85 11.9,15.225 16.575,15.5 18.7,15.525 23.75,15.525 26.25,15.525 28.575,15.525 21.175,15.575 30.95,15.6 64.45,15.675 33.125,15.725 4.925,16.2 0.55,16.25 35.7,16.725 38.6,16.725 41.475,16.75 44.375,16.775 47.375,16.775 50.05,16.825 53.75,16.825 57.35,16.825 6.275,17 32.55,17.2 7.8,17.3 1.5,17.45 18.7,17.45 21.2,17.55 64.45,18 52,18.075 56,18.075 60.65,18.075 3.5,18.175 38.25,18.5 40.85,18.5 43.475,18.5 46.075,18.5 48.65,18.5 35.725,18.525 34.15,18.8 24.35,18.9 26.95,18.925 29.2,18.925 4.425,18.95 0.55,19.025 57.4,19.125 6.35,19.15 18.7,19.4 7.8,19.725 26.375,19.8 28.225,19.8 30.1,19.8 41.9,19.8 47.9,19.8 52.1,19.8 53.8,19.8 55.5,19.8 46.125,19.825 35.475,19.85 40.1,19.85 38,19.875 61.4,19.875 62.65,19.875 63.9,19.875 59.8,19.975 11.9,20.05 16.575,20.275 27.65,20.575 29.05,20.575 30.5,20.575 40.275,20.575 41.9,20.575 43.55,20.575 45.2,20.575 46.8,20.575 48.5,20.575 50.05,20.575 53.95,20.575 55.8,20.575 52.05,20.6 60.8,20.725 62,20.725 63.2,20.725 64.4,20.725 22.35,20.75 24.325,20.75 4.825,20.8 1.5,20.9 31.325,20.95 2.4,20.975 57.4,21.075 59.1,21.075 38.4,21.275 60.225,21.325 18.7,21.35 41.7,21.575 44.3,21.575 46.85,21.575 49.5,21.575 51,21.575 53.45,21.575 54.85,21.575 39.35,21.625 27.65,21.675 29.05,21.675 30.35,21.675 31.75,21.675 37.275,21.775 0.55,21.8 26.325,21.8 55.8,22.025 60.225,22.075 32.55,22.225 38.45,22.225 3.225,22.325 50.75,22.375 53.8,22.375 52.35,22.575 37.9,22.775 57.4,22.775 27.65,22.825 29.05,22.825 30.35,22.825 31.75,22.825 39.75,22.825 41.95,22.825 43.95,22.825 45.9,22.825 47.85,22.825 49.75,22.825 54.85,22.825 59.1,22.825 60.225,22.825 22.375,23.125 32.837,23.125 24.375,23.175 60.8,23.175 62,23.175 63.2,23.175 64.4,23.175 18.7,23.3 53,23.375 55.8,23.575 60.225,23.575 42.95,23.675 44.85,23.675 46.95,23.675 48.85,23.675 50.65,23.675 54.1,23.675 32.011,23.725 38.05,23.75 39.15,23.75 40.3,23.75 41.5,23.75 4.775,23.875 26.35,23.975 27.75,24.025 29.05,24.025 30.3,24.025 31.25,24.075 32.837,24.175 53.3,24.275 54.85,24.275 57.4,24.275 59.1,24.275 40.9,24.325 60.225,24.325 2.45,24.5 0.55,24.575 38.8,24.575 39.65,24.575 42.35,24.575 43.35,24.575 44.25,24.575 45.1,24.575 46,24.575 46.95,24.575 47.85,24.575 48.7,24.575 49.6,24.575 50.5,24.575 7.8,24.6 38.016,24.625 40.35,24.825 41.45,24.825 11.9,24.85 24.05,24.85 26.75,24.875 56.9,24.925 16.6,25.05 34.3,25.075 34.9,25.075 35.5,25.075 36.1,25.075 60.225,25.075 54.775,25.15 51.8,25.175 53.1,25.175 53.925,25.175 55.8,25.225 57.925,25.275 58.875,25.275 19.075,25.325 42.85,25.325 43.75,25.325 44.65,25.325 45.55,25.325 46.45,25.325 47.35,25.325 48.25,25.325 49.15,25.325 50.05,25.325 50.95,25.325 42,25.425 34.3,25.675 34.9,25.675 35.5,25.675 36.1,25.675 40.975,25.675 53.425,25.8 54.2,25.8 55,25.8 56.425,25.8 57.475,25.8 58.4,25.8 59.325,25.8 51.525,25.825 55.75,25.975 4.75,26.1 34.3,26.275 34.9,26.275 35.5,26.275 36.1,26.275 42.725,26.65 43.65,26.65 44.675,26.65 45.7,26.65 46.75,26.65 47.8,26.65 48.875,26.65 49.9,26.65 51.35,26.65 22.4,26.825 2.375,26.875 34.3,26.875 34.9,26.875 35.5,26.875 36.1,26.875 32.5,27.2 55.75,27.3 0.55,27.35 51.525,27.475 53.425,27.5 54.2,27.5 54.975,27.5 56.575,27.5 57.425,27.5 58.3,27.5 59.15,27.5 60,27.5 24.175,27.775 19.075,27.8 26.375,27.825 50.9,28.05 55.35,28.075 56.15,28.075 51.8,28.125 53.1,28.125 53.825,28.125 54.6,28.125 57,28.125 57.85,28.125 58.675,28.125 59.5,28.125 60.225,28.225 4.725,28.325 44.95,28.325 45.75,28.325 46.6,28.325 47.45,28.325 48.25,28.325 49.05,28.325 50.15,28.325 33.4,28.7 34.025,28.7 36.35,28.7 27.125,28.925 45.25,29.025 46.15,29.025 47.05,29.05 47.85,29.05 48.75,29.05 50.55,29.05 53.35,29.05 60.225,29.05 41.45,29.075 44.4,29.15 49.55,29.175 42.2,29.275 42.95,29.275 43.7,29.275 39.15,29.325 40.05,29.325 40.775,29.325 7.8,29.475 54.45,29.55 55.8,29.55 57.3,29.55 58.85,29.55 11.9,29.65 2.325,29.825 60.225,29.825 16.7,29.875 45.75,29.875 46.75,29.875 47.85,29.875 48.95,29.875 50.1,29.875 44.8,29.925 41.05,29.975 41.9,29.975 42.85,29.975 43.8,29.975 26.325,30.025 53.05,30.075 0.55,30.125 60.8,30.125 62,30.125 63.2,30.125 64.45,30.125 40.375,30.255 39.6,30.325 38.65,30.35 50.75,30.425 4.75,30.5 60.225,30.575 52.4,30.725 22.5,30.825 54.45,30.975 55.8,30.975 57.3,30.975 58.85,30.975 27.375,31.025 42.85,31.125 44.45,31.125 46.25,31.125 48.1,31.125 49.925,31.15 39.7,31.175 40.575,31.175 41.45,31.175 26.425,31.275 35.925,31.35 53.325,31.375 60.225,31.375 52.05,31.425 51.05,31.45 19.075,31.5 36.5,31.65 28.3,31.725 29.325,31.75 30.225,31.75 31.1,31.75 37.75,32 38.675,32 39.575,32 40.475,32 60.25,32.125 27.4,32.225 41.275,32.275 43.45,32.275 45.6,32.275 47.775,32.275 50.05,32.275 53.2,32.275 36.5,32.35 57.3,32.425 58.85,32.425 28.525,32.55 60.8,32.575 62,32.575 63.2,32.575 55.75,32.625 64.45,32.625 29.55,32.65 30.475,32.75 40.075,32.775 26.425,32.825 4.975,32.85 0.55,32.9 2.4,32.925 40.875,33.125 52.05,33.175 54.4,33.175 51.05,33.2 22.5,33.35 61.4,33.375 62.65,33.375 63.85,33.375 28.05,33.4 59.9,33.525 29.8,33.575 31.225,33.575 32.5,33.575 33.75,33.575 36.75,33.575 37.775,33.575 38.85,33.575 39.9,33.575 41.775,33.6 44.075,33.6 46.6,33.6 48.875,33.6 34.775,33.725 19.075,33.95 24,34.075 33.1,34.075 37.25,34.075 38.325,34.075 42.8,34.075 45.225,34.075 47.7,34.075 50.05,34.075 53.2,34.075 39.4,34.1 40.65,34.1 34.225,34.3 36.375,34.35 7.8,34.375 35.275,34.375 11.9,34.45 26.425,34.575 16.7,34.6 28.05,34.675 29.8,34.75 31.85,34.75 56.85,34.825 54.4,34.875 55.75,34.875 60.65,34.875 64.45,34.925 38.35,34.95 41.6,35 39.425,35.025 33.55,35.075 37.35,35.075 52.05,35.075 35.475,35.125 51.05,35.125 4.625,35.325 2.4,35.375 32.725,35.575 34.475,35.575 36.4,35.575 0.55,35.675 22.5,35.875 38.45,35.875 40.65,35.875 42.8,35.875 45.3,35.875 47.7,35.875 50,35.875 53.2,35.875 26.45,36.175 28.05,36.175 29.75,36.175 31.2,36.375 32.95,36.375 19.075,36.4 34.65,36.425 36.6,36.425 52.05,36.675 54.35,36.675 51,36.725 55.75,36.825 64.45,37.05 2.375,37.2 26.45,37.675 31.85,37.675 38.45,37.675 50,37.675 4.625,37.85 60.65,38.025 56.9,38.075 34.125,38.2 40.325,38.2 42.05,38.2 45.975,38.2 36.025,38.225 47.975,38.225 29.85,38.275 52.05,38.275 53.6,38.275 55.025,38.275 28.075,38.3 51,38.375 22.5,38.4 0.55,38.625 19.075,38.825 55.75,39.025 26.45,39.075 27.7,39.075 29.05,39.075 30.45,39.075 32.2,39.075 34.15,39.075 36.1,39.075 38.1,39.075 40,39.075 42,39.075 43.8,39.075 45.4,39.075 47,39.075 48.6,39.075 50.2,39.075 52.7,39.075 54.25,39.075 7.8,39.25 11.9,39.275 64.45,39.35 16.7,39.375 2.375,39.5 51.05,40.1 52.075,40.15 25.5,40.325 29.1,40.375 33.3,40.375 37.2,40.375 40.85,40.375 44.7,40.375 48.55,40.425 22.5,40.95 4.625,41.15 19.05,41.2 64.45,41.35 0.55,41.4 60.65,41.55 2.375,41.575 55.7,41.6 22.5,43.5 19.075,44.075 2.375,44.1 7.8,44.125 11.9,44.125 15.875,44.125 25.925,44.125 29.475,44.125 33,44.125 36.55,44.125 40.125,44.125 43.675,44.125 47.25,44.125 50.825,44.125 0.55,44.175 52.125,44.2 55.475,44.25 58.85,44.25 63.8,44.775 20.775,44.875 61.025,45.975 3.25,46.525 0.55,46.95 10.3,47.025 13.55,47.025 16.125,47.025 18.55,47.025 20.85,47.025 23.05,47.025 7.1,47.05 25.8,47.05 29.45,47.05 33.075,47.05 36.725,47.05 40.35,47.05 44,47.05 47.65,47.05 55.1,47.075 58.35,47.125 51.025,47.175 52.075,47.2 62.2,47.825 3.75,47.95 1.925,48.075 50.95,48.85 23.425,49.425 6.475,49.6 10.25,49.6 13.475,49.6 16.575,49.6 20,49.6 30.275,49.6 34.05,49.6 37.15,49.6 40.55,49.6 43.95,49.6 47.35,49.6 51.6,49.6 55.875,49.7 0.55,49.725 27.475,49.75 59.625,50.425 49,50.775 3.825,51.275 6.575,51.275 8.925,51.275 11.65,51.275 14,51.275 16.725,51.275 21.8,51.275 24.15,51.275 30.8,51.275 33.15,51.275 35.875,51.275 38.225,51.275 40.95,51.275 43.3,51.275 46.025,51.275 27.5,51.4 49.675,51.65 56.85,51.925 0.55,52.75 3.525,52.75 6.675,52.75 9.9,52.75 13.125,52.75 16.35,52.75 19.725,52.75 23.1,52.75 26.45,52.75 29.825,52.75 33.25,52.75 36.6,52.75 40.1,52.75 43.525,52.75 46.95,52.75 50.325,52.75 53.625,52.75
  other v2: 56.525,6.4 53.825,6.425 53.825,7.575 56.5,7.575 53.85,8.725 56.525,8.725 53.85,9.875 56.5,9.875 53.85,11.025 56.525,11.05
I2C_SCL: I2C.1 J2.10 R6.1 | length 9.4
  Top Layer w0.2: J2.10 2.64,48.285 R6.1 4.35,46.475 3.5,45.625 I2C.1
I2C_SDA: I2C.2 J2.9 R5.1 | length 11.6
  Top Layer w0.2: I2C.2 3.5,40.796 4.5,41.796 v2(4.5,44.725) 4.5,45.5 R5.1
  MidLayer2 w0.2: v2(4.5,44.725) 4.5,50.1 J2.9@5.175,50.775
MISO: J2.5 U1.16 | length 55.4
  Top Layer w0.2: v1(35.45,23.253) U1.16
  MidLayer2 w0.2: J2.5 15.34,49.01 20.15,44.2 20.15,19.875 23.3,16.725 30.734,16.725 36.475,22.466 36.475,22.925 36.147,23.253 v1(35.45,23.253)
MOSI: J2.4 U1.17 | length 52.4
  Top Layer w0.2: v1@35.952,22.625 v1(35.952,22.65) U1.17@35.952,24.073
  MidLayer2 w0.2: J2.4 17.675,50.595 17.675,47.175 20.55,44.3 20.55,20.125 23.525,17.15 30.6,17.15 31.2,17.75 35.95,22.5 v1@35.95,22.65
NetANT_1: ANT.1 C10.2 L5.2 | length 1
  Top Layer w0.25: L5.2 C10.2
NetC3_2: C3.2 C4.2 L1.1 L2.2 L3.1 | length 3.8
  Top Layer w0.25: L2.2 L1.1 C3.2 L3.1 C4.2
NetC4_1: C4.1 C5.2 C6.2 L3.2 | length 2.9
  Top Layer w0.25: C4.1@43.5,28.475 C4.1 L3.2 C5.2 C6.2
NetC6_1: C6.1 L4.1 | length 1
  Top Layer w0.25: C6.1 L4.1@47.45,27.475
NetC7_2: C7.2 L4.2 U2.1 | length 1.9
  Top Layer w0.25: L4.2 C7.2 50.125,27.475 50.3,27.3 U2.1@50.35,27.3
NetC8_1: C8.1 C9.2 L5.1 | length 3.3
  Top Layer w0.25: C8.1 C9.2 L5.1
NetC8_2: C8.2 U2.5 | length 1
  Top Layer w0.25: U2.5 C8.2
NetC11_1: C11.1 C13.2 U2.3 | length 10.3
  Top Layer w0.25: C11.1 C13.2 41.95,26.525 42.475,26 U2.3
NetC11_2: C11.2 L6.2 U1.22 | length 2.4
  Top Layer w0.25: U1.22 38.15,26.225 L6.2 C11.2
NetC12_2: C12.2 L6.1 U1.21 | length 2.4
  Top Layer w0.25: U1.21 38.15,25.725 L6.1 C12.2
NetC14_1: C14.1 R4.1 U2.6 | length 2.7
  Top Layer w0.25: R4.1 C14.1 U2.6@52.45,27.3
NetC15_1: C15.1 R3.1 U2.4 | length 2.7
  Top Layer w0.25: R3.1 C15.1 U2.4@52.45,26
NetC17_2: C17.2 L7.1 U1.7
NetFR0_2: FR0.2 FR1.2 J4.2 | length 3.7
  Top Layer w0.3: J4.2 37,2.58 FR0.2 FR1.2
NetJ4_3: J4.3 SX1262.2 | length 2.5
  Top Layer w0.3: J4.3 SX1262.2
NetL2_1: L2.1 U1.23
NetL7_2: L7.2 U1.9
NSS: J1.8 U1.19 | length 56.9
  Top Layer w0.2: v1(34.127,21.426) 35.451,21.426 37.5,23.475 37.5,24.575 37.35,24.725 U1.19
  MidLayer2 w0.2: J1.8 27.525,50.8 20.975,44.25 20.975,20.225 23.625,17.575 30.275,17.575 34.125,21.425 v1(34.127,21.426) 34.127,21.302 v1@34.125,21.3
OPT: J4.4 XTAL.2 | length 2.5
  Top Layer w0.3: XTAL.2 42.1,2.56 J4.4
SCK: J2.6 U1.18 | length 57.3
  Top Layer w0.2: U1.18 v1(36.9,24.075)
  MidLayer2 w0.2: J2.6 12.85,50.8 12.875,50.775 13.075,50.775 19.75,44.1 19.75,19.75 23.175,16.325 30.9,16.325 36.9,22.325 v1(36.9,24.075)
SX_NRESET: J4.1 U1.15 | length 21.8
  Top Layer w0.2: v1(34.95,22.65) U1.15
  MidLayer2 w0.2: J4.1 34.5,5.125 34.975,5.6 v2(34.975,16.3)
  Bottom Layer w0.2: J4.1 J4.1@34.525,2.565 ; v1(34.95,22.65) 34.975,22.625 v2(34.975,16.3)
VDD_3V3: ANA_A5_A6.3 C21.2 DIO_D9_D10.3 FR0.1 I2C.3 R2.1 R5.2 R6.2 XTAL.1 | length 84.8
  Top Layer w0.65: DIO_D9_D10.3 1.6,25.65 ; ANA_A5_A6.3@3.525,12.625 7.025,12.625 ; R6.2@5.55,46.375 R5.2 5.55,39.5 4.7,38.65 I2C.3 2.325,38.65 1.6,37.925 1.6,25.65 ; v2@18.325,12.625 7.025,12.625 ; v2(21.625,8.425) v2(22.25,7.8) 22.65,7.4 37.025,7.4 ; FR0.1 37,7.375 37.025,7.4 ; XTAL.1 40.875,7.4 37.025,7.4 ; 1.6,25.65 1.6,22.85 7.025,17.425 7.025,12.625
  Top Layer w0.8: ANA_A5_A6.3 ANA_A5_A6.3@3.525,12.625
  MidLayer2 w0.65: v2@18.375,12.625 18.375,11.675 v2(21.625,8.425) v2(22.25,7.8)
  other v2: 18.375,12.6
VDD_MBED: C22.2 C23.2 J3.4 R1.2 R2.2
VDD_RADIO: C16.2 C18.2 C20.2 R1.1 U1.1 U1.10 U1.11
  other v2: 37.875,29.8 32.45,30.475 37.875,30.5 32.45,31.25 32.1,31.95
VR_PA: C1.2 C2.2 L1.2 U1.24
XTA: Q1.3 U1.3 | length 6.8
  Top Layer w0.127: U1.3 35.45,28.45 v1(35.7,28.7)
  Top Layer w0.35: Q1.3 v1(35.875,33.7)
  MidLayer1 w0.127: v1(35.7,28.7) 35.7,29 35.475,29.225 35.475,33.325 v1@35.863,33.713
XTB: Q1.1 U1.4 | length 4.6
  Top Layer w0.127: v1(34.7,28.7) 34.95,28.45 U1.4
  Top Layer w0.35: v1(34.525,31.5) Q1.1
  MidLayer1 w0.127: v1(34.525,31.5) 34.9,31.125 34.9,29.197 34.7,28.997 v1(34.7,28.7)
  MidLayer1 w0.2: v1@34.5,31.475 v1(34.525,31.5)
pads on no net: J1.1 J1.2 J1.3 J1.5 J1.7 J2.8 J3.1 J3.2 J3.3 J3.5 J3.8

## Polygon pours and split planes (outlines as drawn)
GND on Top Layer "Top GND" (solid, remove dead copper, pour order 7): 0.25,0.25 64.751,0.25 64.751,53.05 0.25,53.05
GND on MidLayer1 "GND midlayer1" (solid, pour order 9): 0.25,0.25 64.733,0.25 64.733,53.05 0.25,53.05
GND on Bottom Layer "Bottom GND" (solid, pour order 10): 0.25,0.25 64.747,0.25 64.747,53.05 0.25,53.05
GND on MidLayer2 "GND midlayer2" (solid, pour order 8): 0.25,0.25 64.725,0.25 64.725,53.05 0.25,53.05

## Keep-outs
Keep-Out Layer:
  the board outline again, w0.05

## Other copper
Top Layer:
  region net GND: 20.88,10.04 20.88,11.915 21.45,11.915 21.45,10.04
  region net GND: 20.58,5.65 20.58,7.525 21.15,7.525 21.15,5.65
  region net GND: 17.72,5.1 17.72,12.17 16.825,12.17 16.825,5.1
  region net GND: 37.45,32.3 37.45,31.628 40.125,31.628 40.125,32.3
  pour cut-out: 55.75,0.35 57.025,0.8 58.473,1.479 58.65,1.575 58.667,1.575 58.813,1.663 59.275,1.95 59.3,1.975 59.61,2.158 59.725,2.25 59.75,2.275 60.225,2.625 60.3,2.7 60.325,2.725 60.698,3.027 60.773,3.102 61.898,4.227 62.011,4.339 62.706,5.196 62.851,5.399 63.175,5.95 63.3,6.15 63.55,6.55 63.664,6.781 63.85,7.1 63.935,7.332 64.103,7.673 64.225,8 64.338,8.304 64.468,8.653 64.563,8.92 64.669,9.193 64.75,9.4 64.9,9.4 64.9,0.2 64.875,0.175 55.725,0.175 55.725,0.35 55.75,0.375
  pour cut-out: 55.725,53.05 57.675,52.2 57.798,52.146 58.075,52.026 58.25,51.925 58.581,51.735 58.745,51.641 59.075,51.45 59.175,51.375 59.425,51.225 59.55,51.15 59.9,50.9 60.002,50.827 60.525,50.425 60.6,50.35 60.625,50.325 61.125,49.925 61.475,49.575 61.5,49.525 61.525,49.5 61.825,49.2 61.875,49.125 61.9,49.1 62.1,48.825 62.15,48.775 62.6,48.25 62.7,48.1 62.975,47.725 63.05,47.6 63.3,47.2 63.379,47.052 63.575,46.74 63.65,46.6 63.834,46.255 63.899,46.075 64.05,45.75 64.15,45.5 64.229,45.302 64.329,45.052 64.375,44.9 64.45,44.65 64.55,44.4 64.65,44.125 64.925,44.125 64.925,53.05 64.875,53.1 64.825,53.05
  region net VDD_RADIO: 19.15,22.9 23.625,27.375 23.85,27.375 23.85,25.325 20.725,22.2 19.85,22.2
  region net VDD_RADIO: 29.425,26.15 29.725,25.85 29.425,25.85
  region net VDD_RADIO: 23.725,27.25 23.85,27.375 26.85,27.375 27.55,28.075 27.55,30.575 28.275,31.3 32.775,31.3 32.775,29.575 29.7,29.575 29.45,29.325 29.45,25.875 31.775,25.875 31.775,25.162 31.085,24.5 27.825,24.5 27.8,24.5 26.95,25.325 23.725,25.325
  region net VDD_RADIO: 29.55,31.3 32.775,31.3 32.775,29.656 29.525,29.656 29.525,31.275
  region: 19.125,22.747
  region net VDD_RADIO: 19.15,22.905 20.75,22.905 20.75,9.525 20.475,9.25 19.15,9.25
  region net VDD_3V3: 18.85,9.248 18.85,12.752 18.652,12.95 17.877,12.95 17.625,12.698 17.625,12.473 17.85,12.248 17.85,9.248
  region net VDD_MBED: 18.575,1.725 19.675,1.725 20.45,2.5 20.45,8.7 17.85,8.7 17.85,2.45
  pour cut-out: 36.75,30.1 36.75,33.225 36.825,33.3 39.8,33.3 39.8,32.3 37.45,32.3 37.45,30.1
  pour cut-out: 30.75,32.275 32.9,32.275 32.9,28.1 37.4,28.1 37.4,31.075 34,31.075 34,33.275 30.75,33.275
  region net VDD_RADIO: 31.525,32.275 31.525,30 32.775,30 32.775,31.975 32.475,32.275
  region net GND: 35.8,26.875 35.8,28.225 36.1,28.525 36.1,28.815 36.225,28.94 36.475,28.94 36.6,28.815 36.6,28.6 36.44,28.44 36.315,28.44 36.15,28.275 36.15,26.875
  region net GND: 34.6,28.225 34.3,28.525 34.3,28.825 34.175,28.95 33.275,28.95 33.125,28.8 33.125,28.6 33.3,28.425 34.075,28.425 34.25,28.25 34.25,26.875 34.6,26.875
  pour cut-out: 38.3,29.05 41.048,29.05 41.05,29.048 41.05,29.02 38.3,29.02
  pour cut-out: 41.902,25.624 42.5,25.624 42.5,25.702 41.902,25.702
  region net GND: 39.975,24.575 39.975,25.95 41.898,25.95 42.227,25.624 51.525,25.624 51.525,25.1 40.7,25.1 40.7,24.575
  region net NetANT_1: 60.1,26.975 60.225,26.975 60.625,27.375 61.1,27.375 61.1,25.925 60.625,25.925 60.225,26.325 60.1,26.325
  pour cut-out: 64.8,23.475 60.5,23.475 60.5,29.825 64.8,29.825
  pour cut-out: 37.735,24.375 37.735,24.79 37.5,25.025 37.5,24.425 37.55,24.375
  region net GND: 51.975,22.525 51.975,23.75 53.1,23.75 53.1,23.25 52.35,23.25 52.35,22.525
  region net GND: 53.15,26.075 60.05,26.075 60.05,25.35 53.15,25.35
  region net GND: 50.55,28.05 44.075,28.05 44.075,29.075 44.475,29.075 44.475,28.625 50.55,28.625
  region net GND: 41.825,28.05 41.825,29 44.45,29 44.45,29.248 40.975,29.248 40.975,28.05
  region net GND: 38.351,31.85 38.351,29.05 41.381,29.05 41.381,29.875 39.025,29.875 39.025,31.85
  region net GND: 42.268,26.9 42.268,26.739 42.631,26.376 51.425,26.376 51.425,26.9
  region net VR_PA: 37.5,27.225 37.5,27.4 38.35,28.25 40.825,28.25 40.825,28.9 38.1,28.9 36.8,27.6 36.8,27.375 36.775,27.35 36.775,27.225
  region net NetL2_1: 37.15,26.575 37.625,26.575 38.2,27.15 38.775,27.15 38.775,27.8 38.125,27.8 38.125,27.575 37.425,26.875 37.15,26.875
  region net GND: 33.15,24.425 33.15,23.18 32.995,23.025 32.65,23.025 32.65,24.425
  region net GND: 36.1,25.375 37.635,25.375 38.305,24.705 38.305,24.6 37.908,24.6 37.483,25.025 36.1,25.025
  region net VDD_RADIO: 36.3,27.625 36.3,28.075 37.55,29.325 37.55,31.5 38.2,31.5 38.2,29.225 36.6,27.625
  region net GND: 31.65,27.625 31.65,26.925 32.425,26.925 32.8,26.55 34.3,26.55 34.3,26.925 32.925,26.925 32.75,27.1 32.75,27.4 32.525,27.625
  region net NetL7_2: 33.65,26.325 33.575,26.4 32.725,26.4 32.35,26.775 31.575,26.775 31.35,27 31.35,27.625 29.75,27.625 29.75,26.05 33.575,26.05 33.65,26.125
  region net NetC17_2: 29.75,29.325 32.175,29.325 32.95,28.55 32.95,27.975 29.75,27.975
  region net NetC17_2: 31.85,29.325 32.175,29.325 33.55,27.95 33.55,27.225 32.9,27.225 32.9,27.475 31.849,28.526
  pour cut-out: 36.586,24.65 36.542,24.65 33.8,24.65 33.802,24.519 36.586,24.519
  pour cut-out: 36.586,24.6 36.45,24.6 36.45,27.3 33.775,27.3 33.775,27.424 36.58,27.427 36.582,27.425
  pour cut-out: 33.925,27.4 33.925,24.625 33.775,24.625 33.775,27.4
  region net VDD_RADIO: 31.65,25.075 33.3,25.075 33.3,25.375 33,25.375 32.95,25.425 32.95,25.525 33,25.575 33.3,25.575 33.3,25.875 31.65,25.875
  region net GND: 31.04,24.175 31.79,24.925 32.75,24.925 32.75,24.7 32.7,24.65 31.875,24.65 31.725,24.5 31.725,24.175
  region net GND: 52.025,30.925 52.55,30.925 52.55,30.175 53.05,30.175 53.05,29.55 52.025,29.55
  region net GND: 60.12,26.075 60.3,25.895 60.3,25.48 60.5,25.48 60.5,23.275 59.9,23.27 59.9,26.075
  pour cut-out: 41.825,28.025 41.825,29.001 44.072,29.001 44.075,28 44.025,28 44.025,28.95 41.875,28.95 41.875,28.025
  pour cut-out: 44.025,28.05 50.15,28.05 50.153,28.047 50.153,27.8 50.117,27.8 50.117,28 50.05,28 44.025,28
  pour cut-out: 38.106,24.848 39.975,24.848 39.975,26.05 39.9,26.05 39.9,24.92 39.855,24.965 38.106,24.965
  pour cut-out: 42.175,26.9 51.147,26.9 51.15,26.897 51.15,26.953 42.178,26.953 42.175,26.95
  pour cut-out: 52.8,27.751 53.15,27.75 53.15,27.226 55.175,27.226 55.175,27.026 56.324,27.026 56.325,27.226 60.25,27.226 60.25,27.15 56.4,27.15 56.4,26.975 55.1,26.975 55.1,27.15 53.075,27.15 53.072,27.675 52.8,27.675
  pour cut-out: 52.75,25.549 53.15,25.549 53.15,26.073 55.17,26.075 55.17,26.275 56.296,26.275 56.3,26.075 60.298,26.075 60.299,26.15 56.425,26.15 56.425,26.325 55.1,26.325 55.1,26.175 53.05,26.175 53.05,25.675 52.75,25.675
  pour cut-out: 51.797,25.549 51.793,27.75 52.125,27.751 52.125,27.625 51.95,27.625 51.95,25.6 52.1,25.6 52.1,25.549
  pour cut-out: 60.299,27.2 60.299,27.85 60.525,27.85 60.525,27.78 60.375,27.78 60.375,27.2
MidLayer2:
  pour cut-out: 64.8,23.475 60.5,23.475 60.5,29.825 64.8,29.825
  pour cut-out: 55.625,53.075 58.75,51.675 60.292,50.624 62.35,48.6 62.475,48.4 62.868,47.845 62.975,47.7 63.222,47.323 63.332,47.154 63.475,46.875 63.55,46.775 63.7,46.5 63.773,46.324 63.889,46.069 63.985,45.855 64.115,45.595 64.2,45.35 64.285,45.104 64.375,44.9 64.418,44.722 64.47,44.573 64.521,44.424 64.6,44.15 64.65,44.033 64.725,43.8 64.8,43.625 64.9,43.625 64.9,53.075 64.875,53.1 64.85,53.075
  pour cut-out: 55.725,0.325 57.1,0.85 58.503,1.47 58.875,1.7 59.076,1.824 59.575,2.15 59.74,2.26 60.363,2.737 60.5,2.85 62.187,4.56 62.288,4.687 62.753,5.273 62.85,5.425 63.151,5.899 63.275,6.1 63.493,6.454 63.6,6.65 63.75,6.925 63.875,7.2 63.975,7.45 64.125,7.75 64.229,7.979 64.325,8.275 64.425,8.525 64.525,8.825 64.6,9.05 64.718,9.402 64.875,9.675 64.9,9.65 64.9,0.175 55.725,0.175
  pour cut-out: 36.75,30.1 36.75,33.225 36.825,33.3 39.8,33.3 39.8,32.3 37.45,32.3 37.45,30.1
  pour cut-out: 30.75,32.275 32.9,32.275 32.9,29.475 37.45,29.475 37.45,31.075 33.75,31.075 33.75,33.2 33.675,33.275 30.75,33.275
  region net GND: 33.8,27.375 33.8,24.575 36.6,24.575 36.6,27.375
MidLayer1:
  pour cut-out: 64.8,23.475 60.5,23.475 60.5,29.825 64.8,29.825
  pour cut-out: 55.625,53.1 56.187,52.813 57.15,52.475 57.4,52.4 57.7,52.25 57.925,52.15 58.225,51.975 58.425,51.9 58.775,51.7 58.95,51.6 59.245,51.38 59.425,51.275 59.975,50.9 60.1,50.8 60.573,50.422 60.647,50.347 61.425,49.6 61.776,49.218 61.847,49.147 62.425,48.475 62.5,48.375 62.875,47.875 62.95,47.75 63.175,47.4 63.25,47.3 63.43,47.003 63.493,46.846 63.7,46.5 63.775,46.325 63.904,46.077 64.025,45.825 64.125,45.575 64.2,45.375 64.275,45.175 64.376,44.925 64.45,44.675 64.6,44.225 64.65,44.075 64.725,43.85 64.775,43.75 64.85,43.725 64.85,53.1 55.625,53.1 55.924,52.947 56.1,52.9 56.318,52.758 56.675,52.7 56.775,52.65 56.925,52.625
  pour cut-out: 55.775,0.325 55.895,0.362 56.1,0.45 56.275,0.525 56.356,0.56 56.544,0.64 56.697,0.706 56.925,0.775 57.1,0.85 57.296,0.934 57.903,1.194 57.923,1.198 58.099,1.278 58.225,1.35 58.25,1.35 58.499,1.478 58.6,1.55 58.847,1.705 59,1.8 59.25,1.95 59.35,2 59.382,2.039 59.468,2.093 59.575,2.15 59.9,2.4 60.015,2.488 60.7,3.025 60.75,3.075 61.35,3.675 61.375,3.7 62.1,4.45 62.186,4.539 62.675,5.15 62.75,5.275 62.975,5.6 63.058,5.72 63.225,6 63.3,6.1 63.45,6.375 63.527,6.506 63.7,6.8 63.782,6.996 63.875,7.2 63.944,7.353 64.025,7.525 64.12,7.727 64.2,7.925 64.272,8.101 64.35,8.3 64.435,8.546 64.5,8.75 64.58,8.999 64.628,9.149 64.7,9.35 64.7,9.525 64.789,9.575 64.9,9.6 64.875,9.575 64.875,0.175 55.775,0.175
  region net GND: 35.114,33.425 35.114,28.375 35.261,28.375 35.261,33.425
  pour cut-out: 37.45,29.475 35.35,29.475 35.35,30.775 37.45,30.775
  pour cut-out: 33.975,31.075 33.975,30.55 37.125,30.55 37.125,31.075
  pour cut-out: 36.75,30.1 36.75,33.226 36.824,33.3 39.8,33.3 39.8,32.3 37.45,32.3 37.45,30.1
  pour cut-out: 30.75,32.275 32.9,32.275 32.9,29.475 35.025,29.475 35.025,31.075 33.75,31.075 33.75,33.2 33.675,33.275 30.75,33.275
  region net GND: 33.7,27.5 33.7,24.475 36.643,24.475 36.643,27.5
Bottom Layer:
  pour cut-out: 55.6,53.05 56.8,52.6 58.6,51.775 58.75,51.675 59.05,51.5 59.171,51.394 59.604,51.106 59.725,51.025 60.275,50.625 60.375,50.525 62.196,48.722 62.312,48.587 62.775,47.975 62.83,47.88 63.05,47.55 63.17,47.395 63.387,47.037 63.465,46.91 63.6,46.675 63.6,46.65 63.666,46.559 63.775,46.325 63.869,46.122 63.999,45.849 64.099,45.625 64.2,45.35 64.262,45.18 64.32,45.023 64.385,44.845 64.448,44.674 64.529,44.451 64.575,44.325 64.664,44.08 64.7,43.925 64.775,43.7 64.85,43.675 64.9,53.1 55.6,53.1
  pour cut-out: 55.75,0.325 56.975,0.775 58.588,1.562 58.775,1.675 59.213,1.938 59.418,2.061 60.025,2.475 60.406,2.735 61.811,4.173 62.413,4.862 62.867,5.481 62.979,5.621 63.25,6.05 63.337,6.237 63.575,6.625 63.709,6.844 63.875,7.2 63.992,7.468 64.125,7.775 64.22,8.077 64.334,8.332 64.437,8.594 64.516,8.794 64.625,9.15 64.678,9.324 64.763,9.6 64.925,9.625 64.9,9.6 64.9,0.175 55.775,0.175 55.75,0.2
  pour cut-out: 36.75,30.1 36.75,33.225 36.825,33.3 39.8,33.3 39.8,32.3 37.45,32.3 37.45,30.1
  pour cut-out: 30.75,32.275 32.85,32.275 32.85,29.475 37.45,29.475 37.45,31.075 33.75,31.075 33.75,33.2 33.675,33.275 30.75,33.275
  region net VDD_RADIO: 31.75,32.275 31.75,29.1 38.225,29.1 38.225,31.026 37.525,31.029 37.525,29.475 32.825,29.475 32.825,32.275
  region net GND: 33.75,27.375 33.75,24.575 36.65,24.575 36.65,27.375

## Silkscreen, mask and mechanical layers (free items; w line width, h text height)
Top Overlay:
  lines w0.15: 53.2,25.975 53.2,22.525 29.475,22.525 29.475,33.7 53.2,33.7 53.2,27.325
  text "1" at 48.55,50.375 h1
  text "1" at 26.925,50.325 h1
  text "J2" at 24.175,47.75 h1.27
  text "J1" at 46.225,47.65 h1.27
  text "Sensors" at 1.1,47.4 h1.4
  text "SX1262MB2xAS mbed shield" at 23.3,44.25 h1.5
  text "SCL SDA" at 6.5,44 h0.8 r270
  text "PCB_E499V01B 3118" at 31,41.25 h1.27
  text "SX1262" at 45.224,34.275 h1.4
  text "D9 D10" at 6.5,30.5 h0.8 r270
  text "A5 A6" at 6.5,17.5 h0.8 r270
  text "Freq Band:" at 49.75,12.625 h1.27
  text "J3" at 10.225,4.475 h1.27
  text "J4" at 33.25,4.4 h1.27
  text "1" at 9.425,2.175 h1
  text "1" at 32.675,2.175 h1
Bottom Overlay:
  text "RoHS" at 11.794,29.37 h2.2 r270
  text "compliant" at 10.244,27.32 h2.2 r270
  text "PCB_E499V01B 3118" at 0.75,17.7 h1.27 r270
Bottom Solder:
  region: 33.9,27.275 33.9,24.675 36.5,24.675 36.5,27.275
Mechanical 3:
  text "Origin(0;0)" at -10.425,-1.9 h1
Mechanical 14:
  the board outline again, w0.05

## Dimensions
0,0 to 65,0 on Mechanical 3
0,53.3 to 0,0 on Mechanical 3
52.3,40.6 to 66.852,55.152 on Mechanical 3

## Text inside footprints (layer, text, board x,y; h text height)
Q1: Top Overlay "1" at 33.7,31.075 h0.5
Shield: Top Overlay "1" at 27.625,21.275 h1
U1: Top Overlay "1" at 37.9,28.125 h0.6